# Altium PCB ChrisByrd-IoT_Product.PcbDoc (part 4 of 6)
Units mil, origin at the board's own origin, x right, y up, seen from the top; angles counter-clockwise.
Board outline 5314.96 x 4000 mil, 2 copper layers (Top Layer, Bottom Layer), stack 57 mil thick; 306 components, 230 nets, 1006 pads, 531 vias.
Unrouted connection lines stored in the file: 476.
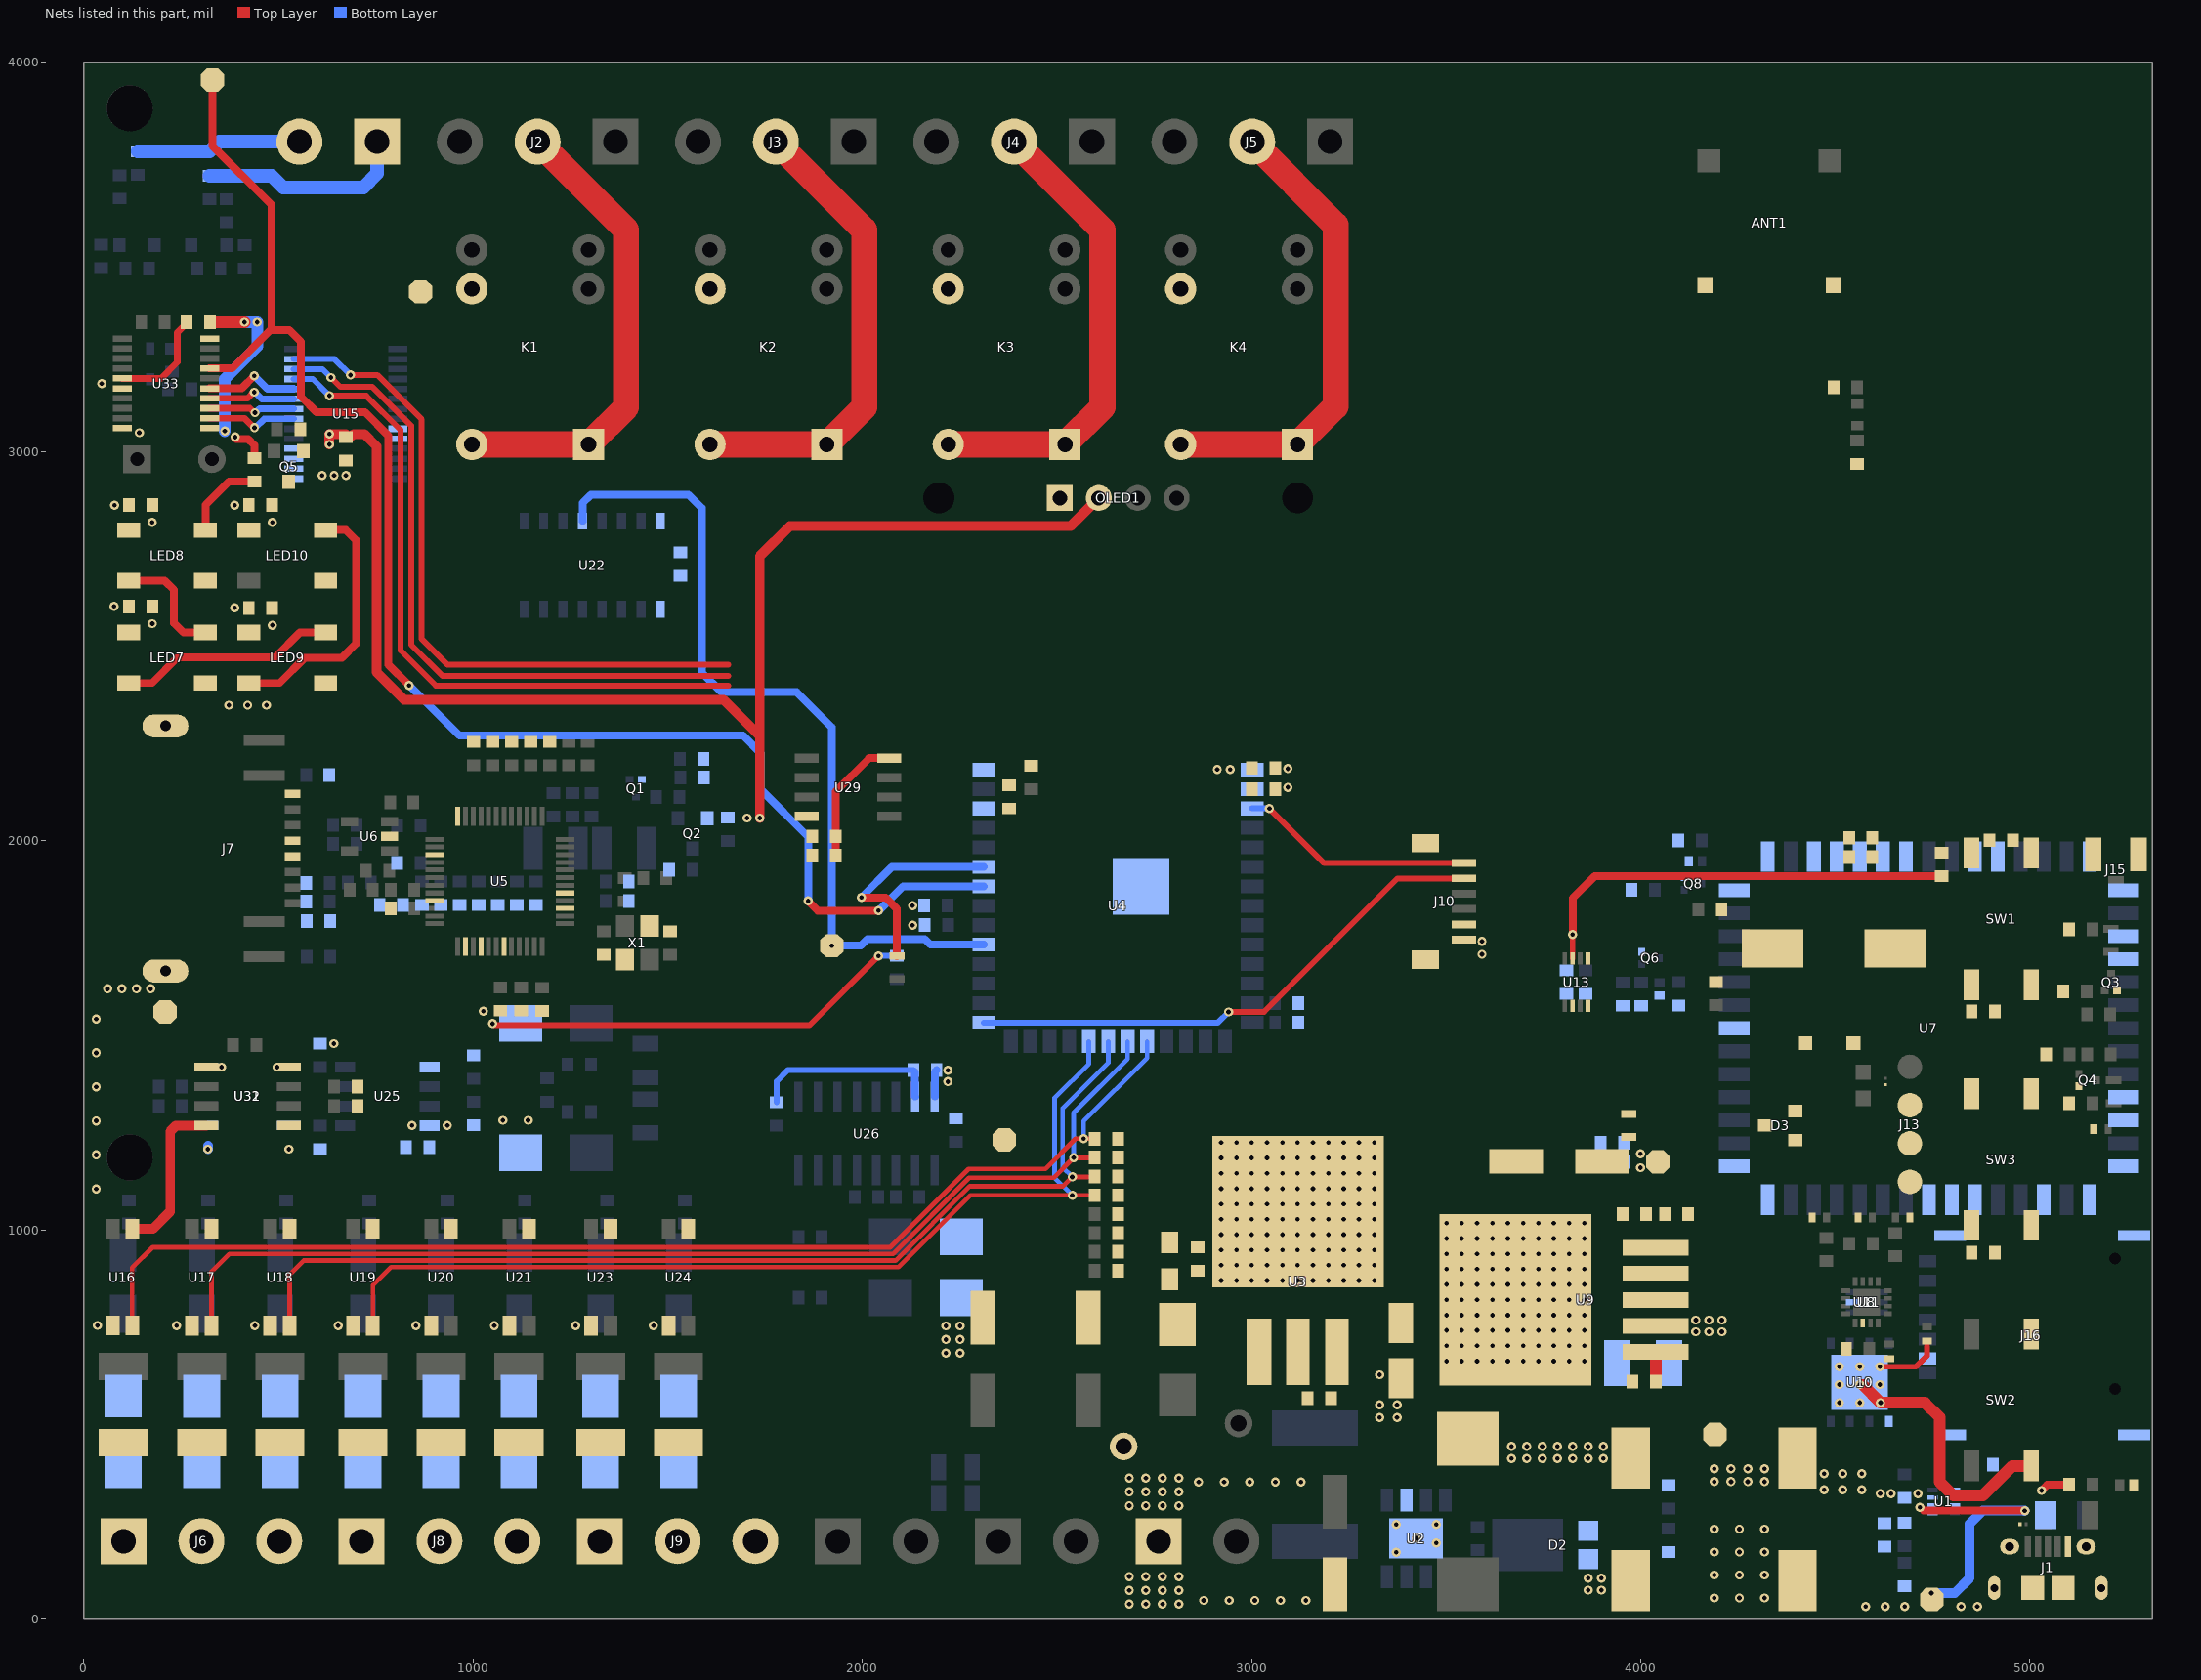
[diagram p2: the nets of this part, all layers, seen from the top]

## Part data (continued)
R8 R26 R37: library part RC0603FR-070RL, "RES SMD 0R, 1%, 0.1W, 0603", LCSC Part Number=C100044, Manufacturer=Yageo, Package=0603, ComponentLink9Description=LCSC, ComponentLink9URL=https://www.lcsc.com/product-detail/Chip-Resistor-Surface-Mount_YAGEO-RC0603FR-070RL_C100044.html, Item Type=Resistor, Manufacturer Part Number=RC0603FR-070RL
R9 R10 R18 R19: library part RC0603FR-0749R9L, "RES 49.9 OHM 1% 1/10W 0603", Case Code (Imperial)=0603, Case Code (Metric)=1608, LCSC Part Number=C114625, Manufacturer=Yageo, Max Operating Temperature=155°C, Max Power Dissipation=100mW, Min Operating Temperature=-55°C, Resistance Tolerance=1%, Resistor Type="Thick Film", Temperature Coefficient=100ppm/°C, Voltage Rating=50V, Case/Package=0603, Category="Chip SMD Resistors", ComponentLink1Description=https://datasheet.ciiva.com/11808/0900766b80f96399-11808223.pdf?src-supplier=RSComponents, ComponentLink1URL=https://datasheet.ciiva.com/11808/0900766b80f96399-11808223.pdf?src-supplier=RSComponents, ComponentLink2Description=https://datasheet.ciiva.com/22747/443971-22747527.pdf?src-supplier=Element14, ComponentLink2URL=https://datasheet.ciiva.com/22747/443971-22747527.pdf?src-supplier=Element14, ComponentLink3Description=https://datasheet.ciiva.com/15189/getdatasheetpartid-325421-15189750.pdf?src-supplier=Verical, ComponentLink3URL=https://datasheet.ciiva.com/15189/getdatasheetpartid-325421-15189750.pdf?src-supplier=Verical, Construction=Rectangular, Depth=0.8mm, Features="Moisture Resistant", Height=0.45mm, Item Type=Resistor, Lead Free="Lead Free", Length=1.6mm, Manufacturer Part Number=RC0603FR-0749R9L, Military Standard=Not, Number of Pins=2, Number of Terminations=2, Packaging="Tape and Reel", Power Rating=100mW, Pricing 1="5000=0.00280 (USD)", REACH SVHC="No SVHC", Resistance=49.9R, RoHS=Yes, RoHS Compliant=Yes, Series=RC, Size Code=0603, Stock 1=2075000, Supplier 1="Arrow Electronics", Supplier Part Number 1=RC0603FR-0749R9L, Technology="THICK FILM", Termination=SMD/SMT, Tolerance=1%, Voltage Rating (DC)=50V
R11 R64: library part RC0603FR-0710RL, "RES SMD 10 OHM 1% 1/10W 0603", Case Code (Imperial)=0603, Case Code (Metric)=1608, LCSC Part Number=C109318, Manufacturer=Yageo, Max Operating Temperature=155°C, Min Operating Temperature=-55°C, Power Rating=100mW, Supplier Part Number 1=311-10.0HRDKR-ND, Temperature Coefficient=200ppm/°C, Tolerance=1%, Voltage Rating=50V, Case/Package=0603, ComponentLink1Description=http://www.farnell.com/datasheets/1868787.pdf?src-supplier=Element14, ComponentLink1URL=http://www.farnell.com/datasheets/1868787.pdf?src-supplier=Element14, ComponentLink2Description=http://www.yageo.com/documents/recent/PYu-RC0603_51_RoHS_L_4.pdf?src-supplier=Avnet, ComponentLink2URL=http://www.yageo.com/documents/recent/PYu-RC0603_51_RoHS_L_4.pdf?src-supplier=Avnet, ComponentLink3Description=http://documents.rs-components.com/techlib://itc_doclist_GB.htm?stockno=5048984&src-supplier=RSComponents, ComponentLink3URL=http://documents.rs-components.com/techlib://itc_doclist_GB.htm?stockno=5048984&src-supplier=RSComponents, ComponentLink4Description=http://www.yageo.com/documents/recent/PYu-RC0603_51_RoHS_L_4.pdf?src-supplier=Avnet+Europe, ComponentLink4URL=http://www.yageo.com/documents/recent/PYu-RC0603_51_RoHS_L_4.pdf?src-supplier=Avnet+Europe, Composition="Thick Film", Contact Plating=Tin,Matte, Depth=0.8mm, Height=0.45mm, Lead Free="Lead Free", Length=1.6mm, Manufacturer Part Number=RC0603FR-0710RL, Military Standard=Not, Number of Pins=2, Packaging="Tape and Reel", Pricing 1="1=0.1, 10=0.046, 100=0.0187, 1000=0.0084, 2500=0.00729 (USD)", Radiation Hardening=No, REACH SVHC="No SVHC", Resistance=10R, Stock 1=10836596, Supplier 1=Digi-Key, Termination=SMD/SMT, Voltage Rating (DC)=50V, Width=0.8mm
  R11: Item Type=Resistor
R12 R13 R15 R17: library part RC0603FR-0733RL, "RES SMD 0603 33 Ohm 1% 1/10W", Case Code (Imperial)=0603, Case Code (Metric)=1608, LCSC Part Number=C108661, Manufacturer=Yageo, Max Operating Temperature=155°C, Max Power Dissipation=100mW, Min Operating Temperature=-55°C, Package Quantity=1, Resistance Tolerance=1%, Resistor Type="Thick Film", Supplier Part Number 1=311-33.0HRCT-ND, Temperature Coefficient=100ppm/°C, Voltage Rating=75V, Voltage Rating (DC)=50V, Case/Package=0603, Category="Chip SMD Resistors", ComponentLink1Description=https://datasheet.ciiva.com/11808/0900766b80f96399-11808741.pdf?src-supplier=RSComponents, ComponentLink1URL=https://datasheet.ciiva.com/11808/0900766b80f96399-11808741.pdf?src-supplier=RSComponents, ComponentLink2Description=https://datasheet.ciiva.com/2453/pyu-r-int-thick-7-2453952.pdf?src-supplier=Digi-Key, ComponentLink2URL=https://datasheet.ciiva.com/2453/pyu-r-int-thick-7-2453952.pdf?src-supplier=Digi-Key, ComponentLink3Description=https://datasheet.ciiva.com/2453/pyu-r-int-thick-7-2453953.pdf?src-supplier=Digi-Key, ComponentLink3URL=https://datasheet.ciiva.com/2453/pyu-r-int-thick-7-2453953.pdf?src-supplier=Digi-Key, ComponentLink4Description=https://datasheet.ciiva.com/2453/pyu-r-int-thick-7-2453954.pdf?src-supplier=Digi-Key, ComponentLink4URL=https://datasheet.ciiva.com/2453/pyu-r-int-thick-7-2453954.pdf?src-supplier=Digi-Key, ComponentLink5Description=https://datasheet.ciiva.com/7660/38590-7660792.pdf?src-supplier=Element14, ComponentLink5URL=https://datasheet.ciiva.com/7660/38590-7660792.pdf?src-supplier=Element14, ComponentLink6Description=https://datasheet.ciiva.com/15189/getdatasheetpartid-326673-15189708.pdf?src-supplier=Verical, ComponentLink6URL=https://datasheet.ciiva.com/15189/getdatasheetpartid-326673-15189708.pdf?src-supplier=Verical, ComponentLink7Description=https://datasheet.ciiva.com/7746/443971-7746334.pdf?src-supplier=Element14, ComponentLink7URL=https://datasheet.ciiva.com/7746/443971-7746334.pdf?src-supplier=Element14, ComponentLink8Description=https://datasheet.ciiva.com/7746/443971-7746335.pdf?src-supplier=Element14, ComponentLink8URL=https://datasheet.ciiva.com/7746/443971-7746335.pdf?src-supplier=Element14, ComponentLink9Description=https://datasheet.ciiva.com/46395/443971-46395007.pdf?src-supplier=Element14, ComponentLink9URL=https://datasheet.ciiva.com/46395/443971-46395007.pdf?src-supplier=Element14, Construction=Rectangular, Depth=0.8mm, Features="Moisture Resistant", Height=0.45mm, Item Type=Resistor, Lead Free="Lead Free", Lead Pitch=0.3mm, Length=1.6mm, Manufacturer Part Number=RC0603FR-0733RL, Military Standard=Not, Number of Pins=2, Number of Terminations=2, Packaging="Tape and Reel", Power Rating=100mW, Pricing 1="1=0.10000, 10=0.02400, 100=0.00970, 1000=0.00436, 2500=0.00378 (USD)", REACH SVHC="No SVHC", Resistance=33R, RoHS=Yes, RoHS Compliant=Yes, Series=RC, Size Code=0603, Stock 1=41, Supplier 1=Digi-Key, Technology="THICK FILM", Termination=SMD/SMT, Tolerance=1%, Weight=7.1E-05oz, Width=0.8mm
R20 R21: library part RC0603JR-07330RL, "RES  SMD 330R 100 mW 0603", Case Code (Imperial)=0603, Case Code (Metric)=1608, LCSC Part Number=C105879, Manufacturer=Yageo, Max Operating Temperature=155°C, Max Power Dissipation=100mW, Min Operating Temperature=-55°C, Package Quantity=5000, Resistance Tolerance=5%, Resistor Type="Thick Film", Supplier Part Number 1=311-330GRCT-ND, Temperature Coefficient=100ppm/°C, Voltage Rating=50V, Case/Package=0603, Category="Chip SMD Resistors", Construction=Rectangular, Depth=0.8mm, Features="Moisture Resistant", Height=0.45mm, Item Type=Resistor, Lead Free="Lead Free", Length=1.6mm, Manufacturer Part Number=RC0603JR-07330RL, Military Standard=Not, Number of Pins=2, Number of Terminations=2, Packaging="Tape and Reel", Power Rating=100mW, Pricing 1="1=0.10000, 10=0.02000, 100=0.00800, 1000=0.00360, 2500=0.00312 (USD)", REACH SVHC="No SVHC", Resistance=330R, RoHS=Yes, RoHS Compliant=Yes, Series=RC, Size Code=0603, Stock 1=1074593, Supplier 1=Digi-Key, Termination=SMD/SMT, Tolerance=5%, Voltage Rating (DC)=50V, Width=0.8mm
R25: library part RC0603FR-071ML, "RES SMD 1M OHM 1% 1/10W 0603", Case Code (Imperial)=0603, Case Code (Metric)=1608, LCSC Part Number=C105578, Manufacturer=Yageo, Max Operating Temperature=155°C, Min Operating Temperature=-55°C, Package Quantity=5000, Power Rating=100mW, Resistance=1MR, Supplier Part Number 1=311-1.00MHRDKR-ND, Temperature Coefficient=100ppm/°C, Tolerance=1%, Voltage Rating=50V, Case/Package=0603, ComponentLink1Description=http://www.farnell.com/datasheets/2167052.pdf?src-supplier=Mouser, ComponentLink1URL=http://www.farnell.com/datasheets/2167052.pdf?src-supplier=Mouser, ComponentLink2Description=http://www.farnell.com/datasheets/2167052.pdf?src-supplier=Element14, ComponentLink2URL=http://www.farnell.com/datasheets/2167052.pdf?src-supplier=Element14, ComponentLink3Description=http://documents.rs-components.com/techlib://itc_doclist_GB.htm?stockno=5048956&src-supplier=RSComponents, ComponentLink3URL=http://documents.rs-components.com/techlib://itc_doclist_GB.htm?stockno=5048956&src-supplier=RSComponents, Composition="Thick Film", Depth=0.8mm, Height=0.45mm, Lead Free="Lead Free", Length=1.6mm, Manufacturer Part Number=RC0603FR-071ML, Military Standard=Not, Number of Pins=2, Packaging="Tape and Reel", Pricing 1="1=0.1, 10=0.023, 100=0.0094, 1000=0.00421, 2500=0.00366 (USD)", REACH SVHC="No SVHC", Stock 1=3824601, Supplier 1=Digi-Key, Termination=SMD/SMT, Voltage Rating (DC)=50V, Width=0.8mm
R33: library part RC0603FR-0712K4L, "RES SMD 12.4K OHM 1% 1/10W 0603", Case Code (Imperial)=0603, Case Code (Metric)=1608, LCSC Part Number=C137798, Manufacturer=Yageo, Max Operating Temperature=155°C, Max Power Dissipation=100mW, Min Operating Temperature=-55°C, Package Quantity=1, Resistance=12.4kR, Resistor Type="Thick Film", Supplier Part Number 1=311-12.4KHRCT-ND, Temperature Coefficient=100ppm/°C, Tolerance=1%, Voltage Rating=50V, Working Voltage=75V, Case/Package=0603, Category="Chip SMD Resistors", ComponentLink1Description=https://datasheet.ciiva.com/2454/pyu-r-int-thick-7-2454069.pdf?src-supplier=Digi-Key, ComponentLink1URL=https://datasheet.ciiva.com/2454/pyu-r-int-thick-7-2454069.pdf?src-supplier=Digi-Key, ComponentLink2Description=https://datasheet.ciiva.com/2454/pyu-r-int-thick-7-2454070.pdf?src-supplier=Digi-Key, ComponentLink2URL=https://datasheet.ciiva.com/2454/pyu-r-int-thick-7-2454070.pdf?src-supplier=Digi-Key, ComponentLink3Description=https://datasheet.ciiva.com/2454/pyu-r-int-thick-7-2454071.pdf?src-supplier=Digi-Key, ComponentLink3URL=https://datasheet.ciiva.com/2454/pyu-r-int-thick-7-2454071.pdf?src-supplier=Digi-Key, Construction=Rectangular, Depth=0.8mm, Features="Moisture Resistant", Height=0.022inch, Lead Free="Lead Free", Length=0.063inch, Manufacturer Part Number=RC0603FR-0712K4L, Military Standard=Not, Number of Terminations=2, Packaging="Tape and Reel", Power Rating=100mW, Pricing 1="1=0.10000, 10=0.02400, 100=0.00970, 1000=0.00436, 2500=0.00378 (USD)", RoHS=Yes, RoHS Compliant=Yes, Series=RC, Stock 1=494008, Supplier 1=Digi-Key, Technology="THICK FILM", Termination=SMD/SMT, Voltage Rating (DC)=50V, Width=0.031inch
R34: library part RC0603FR-07470RL, "RES 470 OHM 1% 1/10W 0603", Case Code (Imperial)=0603, Case Code (Metric)=1608, LCSC Part Number=C114669, Manufacturer=Yageo, Max Operating Temperature=155°C, Max Power Dissipation=100mW, Min Operating Temperature=-55°C, Package Quantity=1, Resistance Tolerance=1%, Resistor Type="Thick Film", Supplier Part Number 1=311-470HRCT-ND, Temperature Coefficient=100ppm/°C, Voltage Rating=50V, Working Voltage=75V, Case/Package=0603, Category="Chip SMD Resistors", ComponentLink1Description=https://datasheet.ciiva.com/11808/0900766b80f96399-11808177.pdf?src-supplier=RSComponents, ComponentLink1URL=https://datasheet.ciiva.com/11808/0900766b80f96399-11808177.pdf?src-supplier=RSComponents, ComponentLink2Description=https://datasheet.ciiva.com/7746/1738695-7746359.pdf?src-supplier=Element14, ComponentLink2URL=https://datasheet.ciiva.com/7746/1738695-7746359.pdf?src-supplier=Element14, ComponentLink3Description=https://datasheet.ciiva.com/7746/1738695-7746360.pdf?src-supplier=Element14, ComponentLink3URL=https://datasheet.ciiva.com/7746/1738695-7746360.pdf?src-supplier=Element14, ComponentLink4Description=https://datasheet.ciiva.com/7660/1868787-7660793.pdf?src-supplier=Element14, ComponentLink4URL=https://datasheet.ciiva.com/7660/1868787-7660793.pdf?src-supplier=Element14, ComponentLink5Description=https://datasheet.ciiva.com/46440/1868787-46440907.pdf?src-supplier=Element14, ComponentLink5URL=https://datasheet.ciiva.com/46440/1868787-46440907.pdf?src-supplier=Element14, ComponentLink6Description=https://datasheet.ciiva.com/2454/pyu-r-int-thick-7-2454012.pdf?src-supplier=Digi-Key, ComponentLink6URL=https://datasheet.ciiva.com/2454/pyu-r-int-thick-7-2454012.pdf?src-supplier=Digi-Key, ComponentLink7Description=https://datasheet.ciiva.com/2454/pyu-r-int-thick-7-2454013.pdf?src-supplier=Digi-Key, ComponentLink7URL=https://datasheet.ciiva.com/2454/pyu-r-int-thick-7-2454013.pdf?src-supplier=Digi-Key, ComponentLink8Description=https://datasheet.ciiva.com/2454/pyu-r-int-thick-7-2454014.pdf?src-supplier=Digi-Key, ComponentLink8URL=https://datasheet.ciiva.com/2454/pyu-r-int-thick-7-2454014.pdf?src-supplier=Digi-Key, Construction=Rectangular, Depth=0.8mm, Features="Moisture Resistant", Height=0.022inch, Lead Free="Lead Free", Length=1.6mm, Manufacturer Part Number=RC0603FR-07470RL, Military Standard=Not, Number of Terminations=2, Packaging="Tape and Reel", Power Rating=100mW, Pricing 1="1=0.10000, 10=0.02400, 100=0.00970, 1000=0.00436, 2500=0.00378 (USD)", REACH SVHC="No SVHC", Resistance=470R, RoHS=Yes, RoHS Compliant=Yes, Series=RC, Stock 1=154083, Supplier 1=Digi-Key, Technology="THICK FILM", Termination=SMD/SMT, Tolerance=1%, Width=0.031inch
R36 R39 R100 R101 R102 R103: library part RC0603FR-0722RL, "RES 22 OHM 1% 1/10W 0603", Case Code (Imperial)=0603, Case Code (Metric)=1608, LCSC Part Number=C107701, Manufacturer=Yageo, Max Operating Temperature=155°C, Max Power Dissipation=100mW, Min Operating Temperature=-55°C, Package Quantity=1, Resistance Tolerance=1%, Resistor Type="Thick Film", Temperature Coefficient=100ppm/°C, Voltage Rating=50V, Case/Package=0603, Category="Chip SMD Resistors", ComponentLink1Description=https://datasheet.ciiva.com/11819/0900766b80f96399-11819285.pdf?src-supplier=RSComponents, ComponentLink1URL=https://datasheet.ciiva.com/11819/0900766b80f96399-11819285.pdf?src-supplier=RSComponents, ComponentLink2Description=https://datasheet.ciiva.com/46395/443971-46395032.pdf?src-supplier=Element14, ComponentLink2URL=https://datasheet.ciiva.com/46395/443971-46395032.pdf?src-supplier=Element14, ComponentLink3Description=https://datasheet.ciiva.com/46440/1868787-46440901.pdf?src-supplier=Element14, ComponentLink3URL=https://datasheet.ciiva.com/46440/1868787-46440901.pdf?src-supplier=Element14, ComponentLink4Description=https://datasheet.ciiva.com/2454/pyu-r-int-thick-7-2454355.pdf?src-supplier=Digi-Key, ComponentLink4URL=https://datasheet.ciiva.com/2454/pyu-r-int-thick-7-2454355.pdf?src-supplier=Digi-Key, ComponentLink5Description=https://datasheet.ciiva.com/2454/pyu-r-int-thick-7-2454356.pdf?src-supplier=Digi-Key, ComponentLink5URL=https://datasheet.ciiva.com/2454/pyu-r-int-thick-7-2454356.pdf?src-supplier=Digi-Key, ComponentLink6Description=https://datasheet.ciiva.com/2454/pyu-r-int-thick-7-2454354.pdf?src-supplier=Digi-Key, ComponentLink6URL=https://datasheet.ciiva.com/2454/pyu-r-int-thick-7-2454354.pdf?src-supplier=Digi-Key, Construction=Rectangular, Depth=0.8mm, Features="Moisture Resistant", Height=0.022inch, Item Type=Resistor, Lead Free="Lead Free", Length=0.063inch, Manufacturer Part Number=RC0603FR-0722RL, Military Standard=Not, Number of Pins=2, Number of Terminations=2, Packaging="Tape and Reel", Power Rating=100mW, Pricing 1="5000=0.00133, 10000=0.00131, 20000=0.00127 (USD)", Reach SVHC Compliant=Yes, Resistance=22R, RoHS=Yes, RoHS Compliant=Yes, Series=RC, Size Code=0603, Stock 1=190000, Supplier 1=Avnet, Supplier Part Number 1=RC0603FR-0722RL, Technology="THICK FILM", Termination=SMD/SMT, Tolerance=1%, Voltage Rating (DC)=50V, Width=0.031inch
R40 R43: library part RC0603FR-07180RL, "RES 180 OHM 1% 1/10W 0603", Case Code (Imperial)=0603, Case Code (Metric)=1608, LCSC Part Number=C137786, Manufacturer=Yageo, Max Operating Temperature=155°C, Max Power Dissipation=100mW, Min Operating Temperature=-55°C, Package Quantity=1, Resistance Tolerance=1%, Resistor Type="Thick Film", Temperature Coefficient=100ppm/°C, Voltage Rating=50V, Case/Package=0603, Category="Chip SMD Resistors", ComponentLink1Description=https://datasheet.ciiva.com/2454/pyu-r-int-thick-7-2454469.pdf?src-supplier=Digi-Key, ComponentLink1URL=https://datasheet.ciiva.com/2454/pyu-r-int-thick-7-2454469.pdf?src-supplier=Digi-Key, ComponentLink2Description=https://datasheet.ciiva.com/2454/pyu-r-int-thick-7-2454470.pdf?src-supplier=Digi-Key, ComponentLink2URL=https://datasheet.ciiva.com/2454/pyu-r-int-thick-7-2454470.pdf?src-supplier=Digi-Key, ComponentLink3Description=https://datasheet.ciiva.com/2454/pyu-r-int-thick-7-2454468.pdf?src-supplier=Digi-Key, ComponentLink3URL=https://datasheet.ciiva.com/2454/pyu-r-int-thick-7-2454468.pdf?src-supplier=Digi-Key, ComponentLink4Description=https://datasheet.ciiva.com/7746/443971-7746267.pdf?src-supplier=Element14, ComponentLink4URL=https://datasheet.ciiva.com/7746/443971-7746267.pdf?src-supplier=Element14, ComponentLink5Description=https://datasheet.ciiva.com/7746/443971-7746266.pdf?src-supplier=Element14, ComponentLink5URL=https://datasheet.ciiva.com/7746/443971-7746266.pdf?src-supplier=Element14, ComponentLink6Description=https://datasheet.ciiva.com/15189/getdatasheetpartid-325160-15189622.pdf?src-supplier=Verical, ComponentLink6URL=https://datasheet.ciiva.com/15189/getdatasheetpartid-325160-15189622.pdf?src-supplier=Verical, Construction=Rectangular, Depth=0.8mm, Features="Moisture Resistant", Height=0.022inch, Item Type=Resistor, Lead Free="Lead Free", Length=1.6mm, Manufacturer Part Number=RC0603FR-07180RL, Military Standard=Not, Number of Pins=2, Number of Terminations=2, Packaging="Tape and Reel", Power Rating=100mW, Pricing 1="5000=0.00133, 10000=0.00131, 20000=0.00127 (USD)", Resistance=180R, RoHS=Yes, RoHS Compliant=Yes, Series=RC, Size Code=0603, Stock 1=35000, Supplier 1=Avnet, Supplier Part Number 1=RC0603FR-07180RL, Termination=SMD/SMT, Tolerance=1%, Voltage Rating (DC)=50V, Width=0.8mm
R41 R44 R47 R50 R62 R63 R90 R91 R95 R96 R97 R98 R99 R104: library part RC0603JR-074K7L, "RES SMD 4.7K OHM 5% 1/10W 0603", Case Code (Imperial)=0603, Case Code (Metric)=1608, LCSC Part Number=C105428, Manufacturer=Yageo, Max Operating Temperature=155°C, Min Operating Temperature=-55°C, Power Rating=100mW, Resistance=4.7kR, Supplier Part Number 1=311-4.7KGRCT-ND, Temperature Coefficient=100ppm/°C, Tolerance=5%, Voltage Rating=50V, Case/Package=0603, ComponentLink1Description=http://www.farnell.com/datasheets/443971.pdf?src-supplier=Element14, ComponentLink1URL=http://www.farnell.com/datasheets/443971.pdf?src-supplier=Element14, Composition="Thick Film", Depth=0.8mm, Item Type=Resistor, Lead Free="Lead Free", Length=1.6mm, Manufacturer Part Number=RC0603JR-074K7L, Military Standard=Not, Number of Pins=2, Packaging="Tape and Reel", Pricing 1="1=0.1, 10=0.02, 100=0.0081, 1000=0.00362, 2500=0.00314 (USD)", REACH SVHC="No SVHC", Stock 1=19706643, Supplier 1=Digi-Key, Termination=SMD/SMT, Voltage Rating (DC)=50V, Width=0.8mm
R42 R45 R46 R48 R51 R73: library part RC0603JR-0747KL, "RES 47K OHM 5% 1/10W 0603", Case Code (Imperial)=0603, Case Code (Metric)=1608, LCSC Part Number=C127447, Manufacturer=Yageo, Max Operating Temperature=155°C, Max Power Dissipation=100mW, Min Operating Temperature=-55°C, Package Quantity=5000, Resistance=47kR, Resistance Tolerance=1%, Resistor Type="Thick Film", Temperature Coefficient=100ppm/°C, Tolerance=5%, Voltage Rating=50V, Case/Package=0603, Category="Chip SMD Resistors", ComponentLink1Description=http://www.farnell.com/datasheets/443971.pdf, ComponentLink1URL=http://www.farnell.com/datasheets/443971.pdf, ComponentLink2Description=http://www.mouser.com/catalog/specsheets/RC0603.pdf, ComponentLink2URL=http://www.mouser.com/catalog/specsheets/RC0603.pdf, ComponentLink3Description=https://datasheet.ciiva.com/46395/443971-46395003.pdf?src-supplier=Element14, ComponentLink3URL=https://datasheet.ciiva.com/46395/443971-46395003.pdf?src-supplier=Element14, ComponentLink4Description=https://datasheet.ciiva.com/12558/rc0603-272842-12558744.pdf?src-supplier=Mouser, ComponentLink4URL=https://datasheet.ciiva.com/12558/rc0603-272842-12558744.pdf?src-supplier=Mouser, Composition="Thick Film", Construction=Rectangular, Depth=0.8mm, Features="Moisture Resistant", Height=0.45mm, Lead Free="Lead Free", Length=1.6mm, Manufacturer Part Number=RC0603JR-0747KL, Military Standard=Not, Number of Pins=2, Number of Terminations=2, Packaging="Tape and Reel", Power Rating=100mW, Pricing 1="5000=0.0025, 10000=0.0022, 25000=0.0019, 1=0.0011, 6000=0.001 (USD)", Pricing 2="1=0.10000, 10=0.02300, 100=0.00930, 1000=0.00417, 2500=0.00362 (USD)", REACH SVHC="No SVHC", RoHS=Yes, RoHS Compliant=Yes, Series=RC, Size Code=0603, Stock 1=599135, Stock 2=1087850, Supplier 1=Arrow, Supplier 2=Digi-Key, Supplier Part Number 1=RC0603JR-0747KL, Supplier Part Number 2=311-30.0KHRCT-ND, Termination=SMD/SMT, Voltage Rating (DC)=50V, Width=0.8mm
R53: library part 0603WAF3241T5E, "100mW Thick Film Resistors ±1% 3.24kΩ 0603 Chip Resistor - Surface Mount ROHS", LCSC Part Number=C22994, Manufacturer=UNI-ROYAL, Package=0603, ComponentLink1Description=LCSC, ComponentLink1URL=https://www.lcsc.com/product-detail/Chip-Resistor-Surface-Mount_UNI-ROYAL-Uniroyal-Elec-0603WAF3241T5E_C22994.html, Item Type=Resistor, Manufacturer Part Number=0603WAF3241T5E
R58: library part RC0603FR-07120RL, "RES 120 OHM 1% 1/10W 0603", Case Code (Imperial)=0603, Case Code (Metric)=1608, LCSC Part Number=C114640, Manufacturer=Yageo, Max Operating Temperature=155°C, Max Power Dissipation=100mW, Min Operating Temperature=-55°C, Package Quantity=1, Resistance Tolerance=1%, Resistor Type="Thick Film", Supplier Part Number 1=311-120HRCT-ND, Temperature Coefficient=100ppm/°C, Voltage Rating=50V, Case/Package=0603, Category="Chip SMD Resistors", ComponentLink1Description=https://datasheet.ciiva.com/2553/pyu-r-int-thick-7-2553512.pdf?src-supplier=Digi-Key, ComponentLink1URL=https://datasheet.ciiva.com/2553/pyu-r-int-thick-7-2553512.pdf?src-supplier=Digi-Key, ComponentLink2Description=https://datasheet.ciiva.com/7746/443971-7746248.pdf?src-supplier=Element14, ComponentLink2URL=https://datasheet.ciiva.com/7746/443971-7746248.pdf?src-supplier=Element14, ComponentLink3Description=https://datasheet.ciiva.com/2553/pyu-r-int-thick-7-2553513.pdf?src-supplier=Digi-Key, ComponentLink3URL=https://datasheet.ciiva.com/2553/pyu-r-int-thick-7-2553513.pdf?src-supplier=Digi-Key, ComponentLink4Description=https://datasheet.ciiva.com/7746/443971-7746249.pdf?src-supplier=Element14, ComponentLink4URL=https://datasheet.ciiva.com/7746/443971-7746249.pdf?src-supplier=Element14, ComponentLink5Description=https://datasheet.ciiva.com/2553/pyu-r-int-thick-7-2553514.pdf?src-supplier=Digi-Key, ComponentLink5URL=https://datasheet.ciiva.com/2553/pyu-r-int-thick-7-2553514.pdf?src-supplier=Digi-Key, ComponentLink6Description=https://datasheet.ciiva.com/46395/443971-46395021.pdf?src-supplier=Element14, ComponentLink6URL=https://datasheet.ciiva.com/46395/443971-46395021.pdf?src-supplier=Element14, Construction=Rectangular, Depth=0.8mm, Features="Moisture Resistant", Height=0.022inch, Lead Free="Lead Free", Length=1.6mm, Manufacturer Part Number=RC0603FR-07120RL, Military Standard=Not, Number of Pins=2, Number of Terminations=2, Packaging="Tape and Reel", Power Rating=100mW, Pricing 1="1=0.10000, 10=0.02400, 100=0.00970, 1000=0.00436, 2500=0.00378 (USD)", REACH SVHC="No SVHC", Resistance=120R, RoHS=Yes, RoHS Compliant=Yes, Series=RC, Size Code=0603, Stock 1=839061, Supplier 1=Digi-Key, Termination=SMD/SMT, Tolerance=1%, Voltage Rating (DC)=50V, Width=0.031inch
R68 R69 R75 R76: library part RC0603JR-0756KL, "RES SMD 0603 56K Ohm 5% 0.1W", Case Code (Imperial)=0603, Case Code (Metric)=1608, LCSC Part Number=C137618, Manufacturer=Yageo, Max Operating Temperature=155°C, Max Power Dissipation=100mW, Min Operating Temperature=-55°C, Package Quantity=1, Resistance=56kR, Resistance Tolerance=5%, Resistor Type="Thick Film", Supplier Part Number 1=311-56KGRCT-ND, Temperature Coefficient=100ppm/°C, Voltage Rating=50V, Working Voltage=75V, Case/Package=0603, Category="Chip SMD Resistors", ComponentLink1Description=https://datasheet.ciiva.com/7746/443971-7746519.pdf?src-supplier=Element14, ComponentLink1URL=https://datasheet.ciiva.com/7746/443971-7746519.pdf?src-supplier=Element14, ComponentLink2Description=https://datasheet.ciiva.com/15189/getdatasheetpartid-326541-15189879.pdf?src-supplier=Verical, ComponentLink2URL=https://datasheet.ciiva.com/15189/getdatasheetpartid-326541-15189879.pdf?src-supplier=Verical, ComponentLink3Description=https://datasheet.ciiva.com/7746/443971-7746520.pdf?src-supplier=Element14, ComponentLink3URL=https://datasheet.ciiva.com/7746/443971-7746520.pdf?src-supplier=Element14, ComponentLink4Description=https://datasheet.ciiva.com/2452/pyu-r-int-thick-7-2452986.pdf?src-supplier=Digi-Key, ComponentLink4URL=https://datasheet.ciiva.com/2452/pyu-r-int-thick-7-2452986.pdf?src-supplier=Digi-Key, ComponentLink5Description=https://datasheet.ciiva.com/2452/pyu-r-int-thick-7-2452987.pdf?src-supplier=Digi-Key, ComponentLink5URL=https://datasheet.ciiva.com/2452/pyu-r-int-thick-7-2452987.pdf?src-supplier=Digi-Key, ComponentLink6Description=https://datasheet.ciiva.com/2452/pyu-r-int-thick-7-2452988.pdf?src-supplier=Digi-Key, ComponentLink6URL=https://datasheet.ciiva.com/2452/pyu-r-int-thick-7-2452988.pdf?src-supplier=Digi-Key, Construction=Rectangular, Depth=0.8mm, Features="Moisture Resistant", Height=0.022inch, Lead Free="Lead Free", Length=1.6mm, Manufacturer Part Number=RC0603JR-0756KL, Military Standard=Not, Number of Pins=2, Number of Terminations=2, Packaging="Tape and Reel", Power Rating=100mW, Pricing 1="1=0.10000, 10=0.02000, 100=0.00800, 1000=0.00360, 2500=0.00312 (USD)", REACH SVHC="No SVHC", RoHS=Yes, RoHS Compliant=Yes, Series=RC, Stock 1=305962, Supplier 1=Digi-Key, Technology="THICK FILM", Termination=SMD/SMT, Tolerance=5%, Voltage Rating (DC)=50V, Width=0.031inch
R70: library part RC0603FR-07330KL, "RES 330K OHM 1% 1/10W 0603", Case Code (Imperial)=0603, Case Code (Metric)=1608, LCSC Part Number=C114618, Manufacturer=Yageo, Max Operating Temperature=155°C, Max Power Dissipation=100mW, Min Operating Temperature=-55°C, Resistance Tolerance=1%, Resistor Type="Thick Film", Supplier Part Number 1=9008384, Temperature Coefficient=100ppm/°C, Voltage Rating=75V, Voltage Rating (DC)=50V, Case/Package=0603, Category="Chip SMD Resistors", ComponentLink1Description=https://datasheet.ciiva.com/2455/pyu-r-int-thick-7-2455366.pdf?src-supplier=Digi-Key, ComponentLink1URL=https://datasheet.ciiva.com/2455/pyu-r-int-thick-7-2455366.pdf?src-supplier=Digi-Key, ComponentLink2Description=https://datasheet.ciiva.com/2455/pyu-r-int-thick-7-2455367.pdf?src-supplier=Digi-Key, ComponentLink2URL=https://datasheet.ciiva.com/2455/pyu-r-int-thick-7-2455367.pdf?src-supplier=Digi-Key, ComponentLink3Description=https://datasheet.ciiva.com/2455/pyu-r-int-thick-7-2455365.pdf?src-supplier=Digi-Key, ComponentLink3URL=https://datasheet.ciiva.com/2455/pyu-r-int-thick-7-2455365.pdf?src-supplier=Digi-Key, ComponentLink4Description=https://datasheet.ciiva.com/7746/443971-7746328.pdf?src-supplier=Element14, ComponentLink4URL=https://datasheet.ciiva.com/7746/443971-7746328.pdf?src-supplier=Element14, ComponentLink5Description=https://datasheet.ciiva.com/7746/443971-7746327.pdf?src-supplier=Element14, ComponentLink5URL=https://datasheet.ciiva.com/7746/443971-7746327.pdf?src-supplier=Element14, ComponentLink6Description=https://datasheet.ciiva.com/15189/getdatasheetpartid-323788-15189703.pdf?src-supplier=Verical, ComponentLink6URL=https://datasheet.ciiva.com/15189/getdatasheetpartid-323788-15189703.pdf?src-supplier=Verical, Construction=Rectangular, Depth=0.8mm, Features="Moisture Resistant", Height=0.45mm, Item Type=Resistor, Lead Free="Lead Free", Length=1.6mm, Manufacturer Part Number=RC0603FR-07330KL, Military Standard=Not, Number of Terminations=2, Packaging="Tape and Reel", Pins=2, Power Rating=100mW, Pricing 1="5000=0.0014, 50000=0.0013, 75000=0.0015, 200000=0.0012, 250000=0.0014, 625000=0.0012, 750000=0.0013, 2000000=0.0011, 2500000=0.0012 (USD)", Reach SVHC Compliant=No, RoHS=Yes, RoHS Compliant=Yes, Series=RC, Stock 1=1500000, Supplier 1="Future Electronics", Termination=SMD/SMT, Tolerance=1%, Weight=7.1E-05oz, Width=0.8mm
R72: library part RC0603JR-07100KL, "RES 100K OHM 5% 1/10W 0603", Case Code (Imperial)=0603, Case Code (Metric)=1608, LCSC Part Number=C100048, Manufacturer=Yageo, Max Operating Temperature=155°C, Max Power Dissipation=100mW, Min Operating Temperature=-55°C, Resistance=100kR, Resistance Tolerance=5%, Resistor Type="Thick Film", Supplier Part Number 1=311-100KGRCT-ND, Temperature Coefficient=100ppm/°C, Voltage Rating=50V, Case/Package=0603, Category="Chip SMD Resistors", ComponentLink1Description=https://datasheet.ciiva.com/7746/443971-7746424.pdf?src-supplier=Element14, ComponentLink1URL=https://datasheet.ciiva.com/7746/443971-7746424.pdf?src-supplier=Element14, ComponentLink2Description=https://datasheet.ciiva.com/7983/443971-7983686.pdf?src-supplier=Element14, ComponentLink2URL=https://datasheet.ciiva.com/7983/443971-7983686.pdf?src-supplier=Element14, ComponentLink3Description=https://datasheet.ciiva.com/7746/443971-7746423.pdf?src-supplier=Element14, ComponentLink3URL=https://datasheet.ciiva.com/7746/443971-7746423.pdf?src-supplier=Element14, ComponentLink4Description=https://datasheet.ciiva.com/8887/pyu-rc0603-51-rohs-l-4-8887903.pdf?src-supplier=Avnet, ComponentLink4URL=https://datasheet.ciiva.com/8887/pyu-rc0603-51-rohs-l-4-8887903.pdf?src-supplier=Avnet, Contact Plating=Tin,Matte, Features="Moisture Resistant", Item Type=Resistor, Lead Free="Lead Free", Manufacturer Part Number=RC0603JR-07100KL, Number of Pins=2, Number of Terminations=2, Packaging="Tape and Reel", Power Rating=100mW, Pricing 1="1=0.10000, 10=0.02000, 100=0.00800, 1000=0.00360, 2500=0.00312 (USD)", Radiation Hardening=No, REACH SVHC="No SVHC", RoHS=Yes, RoHS Compliant=Yes, Series=RC, Size Code=0603, Stock 1=1210037, Supplier 1=Digi-Key, Termination=SMD/SMT, Tolerance=5%, Voltage Rating (DC)=50V, Width=0.8mm
R74: library part RT0603BRD0768KL, "RES SMD 68K OHM 0.1% 1/10W 0603", Case Code (Imperial)=0603, Case Code (Metric)=1608, Manufacturer=Yageo, Max Operating Temperature=125°C, Min Operating Temperature=-55°C, Power Rating=100mW, Resistance=68kR, Resistor Type="Thin Film", Supplier Part Number 1=YAG4586CT-ND, Temperature Coefficient=25ppm/°C, Tolerance=0.1%, Voltage Rating=75V, Voltage Rating (DC)=50V, Case/Package=0603, Category="Chip SMD Resistors", ComponentLink1Description=https://datasheet.ciiva.com/12694/pyu-rt-1-to-0-05-rohs-l-4-12694907.pdf?src-supplier=Mouser, ComponentLink1URL=https://datasheet.ciiva.com/12694/pyu-rt-1-to-0-05-rohs-l-4-12694907.pdf?src-supplier=Mouser, Construction=Rectangular, Contact Plating=Tin,Matte, Depth=0.8mm, Lead Free="Lead Free", Length=1.6mm, Manufacturer Part Number=RT0603BRD0768KL, Military Standard=Not, Packaging="Tape and Reel", Pricing 1="1=0.34000, 10=0.28800, 100=0.11260, 1000=0.04716, 2500=0.04322 (USD)", Radiation Hardening=No, RoHS=Yes, RoHS Compliant=Yes, Series=RT, Stock 1=45000, Supplier 1=Digi-Key, Termination=SMD/SMT, Width=800um
R77 R80 R81 R82 R83 R84 R85 R86: library part RC0603FR-072K2L, "RES 2.2K OHM 1% 1/10W 0603", Case Code (Imperial)=0603, Case Code (Metric)=1608, LCSC Part Number=C114662, Manufacturer=Yageo, Max Operating Temperature=155°C, Max Power Dissipation=100mW, Min Operating Temperature=-55°C, Package Quantity=1, Resistance=2.2kR, Resistance Tolerance=1%, Resistor Type="Thick Film", Temperature Coefficient=100ppm/°C, Voltage Rating=50V, Case/Package=0603, Category="Chip SMD Resistors", Construction=Rectangular, Depth=0.8mm, Features="Moisture Resistant", Height=0.022inch, Item Type=Resistor, Lead Free="Lead Free", Length=1.6mm, Manufacturer Part Number=RC0603FR-072K2L, Military Standard=Not, Number of Terminations=2, Packaging="Tape and Reel", Power Rating=100mW, Pricing 1="5000=0.00133, 10000=0.00131, 20000=0.00127 (USD)", RoHS=Yes, RoHS Compliant=Yes, Series=RC, Size Code=0603, Stock 1=733100, Supplier 1=Avnet, Supplier Part Number 1=RC0603FR-072K2L, Termination=SMD/SMT, Tolerance=1%, Width=0.031inch
R109: library part ERJPA3J154V, "RES SMD 150K OHM 5% 1/3W 0603", Case Code (Imperial)=0603, Case Code (Metric)=1608, LCSC Part Number=C445851, Manufacturer=Panasonic, Manufacturer Part Number=ERJ-PA3J154V, Max Operating Temperature=155°C, Max Power Dissipation=250mW, Min Operating Temperature=-55°C, Resistance=150kR, Resistor Type="Thick Film", Temperature Coefficient=200ppm/°C, Tolerance=5%, Case/Package=0603, Category="Chip SMD Resistors", ComponentLink1Description=https://industrial.panasonic.com/cdbs/www-data/pdf/RDO0000/AOA0000C331.pdf?src-supplier=Digi-Key, ComponentLink1URL=https://industrial.panasonic.com/cdbs/www-data/pdf/RDO0000/AOA0000C331.pdf?src-supplier=Digi-Key, Features="Automotive AEC-Q200", Height=0.018inch, Length=0.063inch, Number of Terminations=2, Packaging="Tape and Reel", Pricing 1="1=0.09570, 10=0.08790, 100=0.03390, 1000=0.01520, 2500=0.01310, 5000=0.01070 (USD)", RoHS=Yes, Stock 1=30, Supplier 1="Arrow Electronics", Supplier Part Number 1=ERJ-PA3J154V, Width=0.031inch
R112: "VARISTOR 47V 500A DISC 10MM", Clamping Current=5A, Clamping Voltage=93V, LCSC Part Number=C125513, Manufacturer="TDK EPCOS", Max Operating Temperature=85°C, Max Surge Current=500A, Max Varistor Voltage=51.7V, Max Voltage Rating (AC)=30V, Max Voltage Rating (DC)=38V, Min Operating Temperature=-40°C, Min Varistor Voltage=42.3V, Package Quantity=500, Tolerance=10%, Varistor Voltage=47V, Category=Varistors, ComponentLink1Description=https://datasheet.ciiva.com/11834/0900766b80188ddb-11834267.pdf?src-supplier=Rs, ComponentLink1URL=https://datasheet.ciiva.com/11834/0900766b80188ddb-11834267.pdf?src-supplier=Rs, ComponentLink2Description=https://datasheet.ciiva.com/15155/getdatasheetpartid-111496-15155493.pdf?src-supplier=Verical, ComponentLink2URL=https://datasheet.ciiva.com/15155/getdatasheetpartid-111496-15155493.pdf?src-supplier=Verical, ComponentLink3Description=https://datasheet.ciiva.com/1277/1899727-1277935.pdf?src-supplier=Element14, ComponentLink3URL=https://datasheet.ciiva.com/1277/1899727-1277935.pdf?src-supplier=Element14, Depth=4.4mm, Diameter=10mm, Energy=4.4J, Item Type=Varistor, Lead Length=30mm, Lead Pitch=7.5mm, Lead/Base Style=Radial, Manufacturer Part Number=B72210S0300K101, Mounting Technology="Through Hole,Radial", Number of Circuits=1, Packaging=Bulk, Pricing 1="1=0.3862, 10=0.3035, 25=0.3004, 100=0.2152, 250=0.215, 500=0.1646, 1000=0.1301, 2500=0.1213, 5000=0.1048 (USD)", Reach SVHC Compliant=No, RoHS=Yes, RoHS Compliant=Yes, Series=Standard, Stock 1=14838, Supplier 1="Arrow Electronics", Supplier Part Number 1=B72210S0300K101, Thickness=4.4mm, Voltage Rating (AC)=30V, Voltage Rating (DC)=38V
SB1: "Solder Bridge ON", Manufacturer Part Number="Solder Bridge", Item Type="Solder Bridge"
SW1 SW2 SW3: "50mA Brick nogging SPST 100MΩ 1000000 times 250gf@±30gf 12V SMD Tactile Switches ROHS", LCSC Part Number=C83206, Manufacturer="Korean Hroparts Elec", Package=SMD, ComponentLink1Description=LCSC, ComponentLink1URL=https://www.lcsc.com/product-detail/Tactile-Switches_Korean-Hroparts-Elec-K2-6639SP-C4SC-04_C83206.html, Item Type="Tactile Switch", Manufacturer Part Number=K2-6639SP-C4SC-04
U1: "1.6-V TO 5.5-V, 40-M, 2.5-A, LOW", LCSC Part Number=C3235557, Manufacturer="Texas Instruments", Supplier Part Number 1=595-TPS2116DRLR, Category="Voltage Supervisors", ComponentLink1Description=LCSC, ComponentLink1URL=https://www.lcsc.com/product-detail/Power-Distribution-Switches_Texas-Instruments-TPS2116DRLR_C3235557.html, Item Type=IC, Manufacturer Part Number=TPS2116DRLR, Pricing 1="1=0.9, 10=0.814, 50=0.772, 100=0.634, 1000=0.414, 10000=0.363 (USD)", RoHS=Yes, Stock 1=27931, Supplier 1=Mouser
U2: "IC REG BUCK ADJUSTABLE 5A 8SOPWR", Case/Package=HSOP, LCSC Part Number=C114425, Manufacturer="Texas Instruments", Max Operating Temperature=125°C, Max Output current=5A, Max Output Voltage=31V, Max Supply Voltage=36V, Min Input Voltage=5.5V, Min Operating Temperature=-40°C, Min Output Voltage=1.22V, Package Quantity=1, Quiescent Current=3mA, Supplier Part Number 1=595-TPS5450DDAR, Switching Frequency=500kHz, Category="Voltage Regulators - Switching", ComponentLink1Description=https://datasheet.ciiva.com/15113/getdatasheetpartid-172659-15113657.pdf?src-supplier=Verical, ComponentLink1URL=https://datasheet.ciiva.com/15113/getdatasheetpartid-172659-15113657.pdf?src-supplier=Verical, ComponentLink2Description=https://datasheet.ciiva.com/2035/tps5450-2035367.pdf?src-supplier=Digi-Key, ComponentLink2URL=https://datasheet.ciiva.com/2035/tps5450-2035367.pdf?src-supplier=Digi-Key, ComponentLink3Description=https://datasheet.ciiva.com/2035/tps5450-2035366.pdf?src-supplier=Digi-Key, ComponentLink3URL=https://datasheet.ciiva.com/2035/tps5450-2035366.pdf?src-supplier=Digi-Key, ComponentLink4Description=https://datasheet.ciiva.com/2035/tps5450-2035368.pdf?src-supplier=Digi-Key, ComponentLink4URL=https://datasheet.ciiva.com/2035/tps5450-2035368.pdf?src-supplier=Digi-Key, ComponentLink5Description=https://datasheet.ciiva.com/14303/tps5450-14303689.pdf?src-supplier=Avnet, ComponentLink5URL=https://datasheet.ciiva.com/14303/tps5450-14303689.pdf?src-supplier=Avnet, ComponentLink6Description=https://datasheet.ciiva.com/3220/tps5450-3220230.pdf?src-supplier=Avnet, ComponentLink6URL=https://datasheet.ciiva.com/3220/tps5450-3220230.pdf?src-supplier=Avnet, Efficiency=90%, Height=1.55mm, Item Type=IC, Lead Free="Lead Free", Length=5mm, Manufacturer Part Number=TPS5450DDAR, Mounting Technology="Surface Mount", Number of Outputs=1, Operating Supply Voltage=36V, Output Current=5A, Output Type=Adjustable, Output Voltage=31V, Packaging="Tape and Reel", Pins=8, Pricing 1="1=5.44, 10=4.88, 50=4.62, 100=4, 1000=2.9, 10000=2.8 (USD)", Radiation Hardening=No, RoHS=Yes, RoHS Compliant=Yes, Series=SWIFT™, Stock 1=10304, Supplier 1=Mouser, Synchronous Rectifier=No, Weight=0.00249oz, Width=4mm
U3: "72dB@(120Hz) 5A Fixed 3.3V~3.3V Positive 12V TO-263-3 Linear Voltage Regulators (LDO) ROHS", LCSC Part Number=C259972, Manufacturer=HGSEMI, Package=TO-263-3, ComponentLink1Description=LCSC, ComponentLink1URL=https://www.lcsc.com/product-detail/Linear-Voltage-Regulators-LDO_HGSEMI-LM1084S-3-3-TR_C259972.html, Item Type=IC, Manufacturer Part Number=LM1084S-3.3/TR
U4: "SMD,18x25.5mm WiFi Modules ROHS", LCSC Part Number=C2913204, Manufacturer="Espressif Systems", Supplier Part Number 1=1965-ESP32-S3-WROOM-1-N8R2-ND, Category=Uncategorized, ComponentLink1Description=LCSC, ComponentLink1URL=https://www.lcsc.com/product-detail/WiFi-Modules_Espressif-Systems-ESP32-S3-WROOM-1-N8R2_C2913204.html, Item Type=Module, Manufacturer Part Number=ESP32-S3-WROOM-1-N8R2, RoHS=No, Supplier 1=Digi-Key
U5: "SPI LQFP-48(7x7) Ethernet ICs ROHS", LCSC Part Number=C32843, Manufacturer=WIZNET, Package=LQFP-48(7x7), ComponentLink1Description=LCSC, ComponentLink1URL=https://www.lcsc.com/product-detail/Ethernet-ICs_WIZNET-W5500_C32843.html, Item Type=IC, Manufacturer Part Number=W5500
U6: "TVS DIODE 5.5VWM 8.5VC SOT23-5", Breakdown Voltage=5.5V, Case/Package=SOT-23, Clamping Voltage=7.8V, Clamping Voltage-Max=8V, LCSC Part Number=C10675, Leakage Current=100nA, Manufacturer=Littelfuse, Max Operating Temperature=85°C, Max Power Dissipation=225mW, Min Operating Temperature=-40°C, Power Line Protection=No, Supplier Part Number 1=3283009, Voltage Rating (DC)=5V, Category="TVS Diodes", ComponentLink1Description=https://datasheet.ciiva.com/15143/getdatasheetpartid-152299-15143806.pdf?src-supplier=Verical, ComponentLink1URL=https://datasheet.ciiva.com/15143/getdatasheetpartid-152299-15143806.pdf?src-supplier=Verical, ComponentLink2Description=https://datasheet.ciiva.com/4509/sp05x-leadfree-4509638.pdf?src-supplier=Mouser, ComponentLink2URL=https://datasheet.ciiva.com/4509/sp05x-leadfree-4509638.pdf?src-supplier=Mouser, ComponentLink3Description=https://datasheet.ciiva.com/22697/1911798-22697943.pdf?src-supplier=Element14, ComponentLink3URL=https://datasheet.ciiva.com/22697/1911798-22697943.pdf?src-supplier=Element14, ComponentLink4Description=https://datasheet.ciiva.com/8062/littefuse-spa-sp050x-8062425.pdf?src-supplier=Element14, ComponentLink4URL=https://datasheet.ciiva.com/8062/littefuse-spa-sp050x-8062425.pdf?src-supplier=Element14, ComponentLink5Description=https://datasheet.ciiva.com/332/sp05xxba-332619.pdf?src-supplier=Digi-Key, ComponentLink5URL=https://datasheet.ciiva.com/332/sp05xxba-332619.pdf?src-supplier=Digi-Key, ComponentLink6Description=https://datasheet.ciiva.com/332/sp05xxba-332620.pdf?src-supplier=Digi-Key, ComponentLink6URL=https://datasheet.ciiva.com/332/sp05xxba-332620.pdf?src-supplier=Digi-Key, ComponentLink7Description=https://datasheet.ciiva.com/16393/sp05xxba-16393404.pdf?src-supplier=Future+Electronics, ComponentLink7URL=https://datasheet.ciiva.com/16393/sp05xxba-16393404.pdf?src-supplier=Future+Electronics, ComponentLink8Description=https://datasheet.ciiva.com/332/sp05xxba-332621.pdf?src-supplier=Digi-Key, ComponentLink8URL=https://datasheet.ciiva.com/332/sp05xxba-332621.pdf?src-supplier=Digi-Key, ComponentLink9Description=https://datasheet.ciiva.com/1268/526672-1268494.pdf?src-supplier=Element14, ComponentLink9URL=https://datasheet.ciiva.com/1268/526672-1268494.pdf?src-supplier=Element14, Depth=1.75mm, Diode Type=ZENER, Direction=Unidirectional, ESD Protection=Yes, Height=1.3mm, Item Type="TVS Diode", Lead Free="Lead Free", Length=3.05mm, Manufacturer Part Number=SP0504BAHTG, Max Reverse Leakage Current=100nA, Mounting Technology="Surface Mount", Number of Channels=4, Number of Elements=4, Number of Unidirectional Channels=4, Packaging="Tape and Reel", Peak Pulse Power=225mW, Pins=5, Polarity=Bidirectional,Unidirectional, Power Dissipation=225mW, Pricing 1="1=0.78, 15=0.685, 75=0.625, 300=0.575, 1500=0.52 (USD)", Radiation Hardening=No, Reach SVHC Compliant=Unknown, Reverse Standoff Voltage=5.5V, RoHS=Yes, RoHS Compliant=Yes, Series="SP05, SPA®", Stock 1=1611, Supplier 1="Future Electronics", Termination=SMD/SMT, Width=1.75mm, Working Voltage=5.5V
U7: "SMD,30x30mm 2G/3G/4G/5G Modules ROHS", LCSC Part Number=C126259, Manufacturer=SIMCom, Package=SMD,30x30mm, ComponentLink1Description=LCSC, ComponentLink1URL=https://www.lcsc.com/product-detail/2G-3G-4G-5G-Modules_SIMCom-Wireless-Solutions-SIM7500E_C126259.html, Item Type=IC, Manufacturer Part Number=SIM7500E
U8: "15V 5 Unidirectional 5V SOT-363 ESD Protection Devices ROHS", LCSC Part Number=C5180312, Manufacturer=ElecSuper, Package=SOT-363, ComponentLink1Description=LCSC, ComponentLink1URL=https://www.lcsc.com/product-detail/ESD-Protection-Devices_ElecSuper-SMF05CT1G-ES_C5180312.html, Item Type="ESD Diode", Manufacturer Part Number=SMF05CT1G-ES
U9: "IC REG LDO ADJ 3A TO263-5", Case/Package=TO-263, Dropout Voltage=370mV, Input Bias Current=40nA, LCSC Part Number=C11149, Manufacturer=Microchip, Max Input Voltage=26V, Max Operating Temperature=125°C, Max Output current=3A, Max Output Voltage=25V, Min Input Voltage=2.5V, Min Operating Temperature=-40°C, Min Output Voltage=1.25V, Package Quantity=750, Quiescent Current=35mA, Reference Voltage=1.24V, Supplier Part Number 1=3153683, Accuracy=1%, Category="Voltage Regulators - Linear", ComponentLink1Description=https://datasheet.ciiva.com/23772/1572633-23772885.pdf?src-supplier=Newark, ComponentLink1URL=https://datasheet.ciiva.com/23772/1572633-23772885.pdf?src-supplier=Newark, ComponentLink2Description=https://datasheet.ciiva.com/16296/mic29150-16296190.pdf?src-supplier=Future+Electronics, ComponentLink2URL=https://datasheet.ciiva.com/16296/mic29150-16296190.pdf?src-supplier=Future+Electronics, ComponentLink3Description=https://datasheet.ciiva.com/15200/getdatasheetpartid-143209-15200663.pdf?src-supplier=Verical, ComponentLink3URL=https://datasheet.ciiva.com/15200/getdatasheetpartid-143209-15200663.pdf?src-supplier=Verical, Height=4.59mm, Item Type=IC, Lead Free="Lead Free", Length=10.67mm, Manufacturer Part Number=MIC29302WU-TR, Mount="Surface Mount", Number of Outputs=1, Number of Pins=5, Number of Regulators=1, Output Configuration=Positive, Output Current=3A, Output Type=Adjustable, Output Voltage=26V, Packaging="Tape and Reel", Polarity=Positive, Pricing 1="750=2.12000, 1500=2.09000, 2250=2.07000, 3000=2.06000, 3750=2.02000 (USD)", Radiation Hardening=No, Reach SVHC Compliant=Yes, RoHS=Yes, RoHS Compliant=Yes, Series=-, Supplier 1="Future Electronics", Width=9.17mm
U10: "GLOBAL IOT EMBEDDED SIM CHIP", Manufacturer=Hologram, Supplier Part Number 1=1887-1002-1-ND, ComponentLink1Description=https://media.digikey.com/pdf/Data%20Sheets/Hologram%20PDFs/SIM_DS_170107_v2.pdf?src-supplier=Digi-Key, ComponentLink1URL=https://media.digikey.com/pdf/Data%20Sheets/Hologram%20PDFs/SIM_DS_170107_v2.pdf?src-supplier=Digi-Key, Manufacturer Part Number=SIM-ST-MFF2, Pricing 1="1=6.3, 100=5.985 (USD)", Stock 1=0, Supplier 1=Digi-Key
U11: "IC SWITCH 4PDT 16MLP", LCSC Part Number=C512961, Manufacturer="ON Semiconductor / Fairchild", Max Operating Temperature=85°C, Max Supply Current=1uA, Max Supply Voltage=4.3V, Min Operating Temperature=-40°C, Min Supply Voltage=2.7V, Power Dissipation=500mW, Supplier Part Number 1=9108587, -3db Bandwidth=475MHz, Category="Interface ICs", ComponentLink1Description=https://datasheet.ciiva.com/4918/fsa2567-82876-4918495.pdf?src-supplier=Mouser, ComponentLink1URL=https://datasheet.ciiva.com/4918/fsa2567-82876-4918495.pdf?src-supplier=Mouser, ComponentLink2Description=https://datasheet.ciiva.com/17282/fsa2567-17282630.pdf?src-supplier=Future+Electronics, ComponentLink2URL=https://datasheet.ciiva.com/17282/fsa2567-17282630.pdf?src-supplier=Future+Electronics, ComponentLink3Description=https://datasheet.ciiva.com/2979/fsa2567-2979466.pdf?src-supplier=Avnet, ComponentLink3URL=https://datasheet.ciiva.com/2979/fsa2567-2979466.pdf?src-supplier=Avnet, ComponentLink4Description=https://datasheet.ciiva.com/6638/fsa2567-6638602.pdf?src-supplier=Digi-Key, ComponentLink4URL=https://datasheet.ciiva.com/6638/fsa2567-6638602.pdf?src-supplier=Digi-Key, ComponentLink5Description=https://datasheet.ciiva.com/6638/fsa2567-6638634.pdf?src-supplier=Digi-Key, ComponentLink5URL=https://datasheet.ciiva.com/6638/fsa2567-6638634.pdf?src-supplier=Digi-Key, ComponentLink6Description=https://datasheet.ciiva.com/2979/fsa2567-2979467.pdf?src-supplier=Avnet, ComponentLink6URL=https://datasheet.ciiva.com/2979/fsa2567-2979467.pdf?src-supplier=Avnet, Height=0.75mm, Item Type=IC, Lead Free="Lead Free", Length=3mm, Manufacturer Part Number=FSA2567MPX, Mounting Technology="Surface Mount", Number of Channels=1, Number of Inputs=4, Number of Outputs=8, Packaging="Tape and Reel", Pins=16, Pricing 1="3000=0.375, 6000=0.37, 9000=0.365, 12000=0.36 (USD)", Radiation Hardening=No, Reach SVHC Compliant=No, RoHS=Yes, RoHS Compliant=Yes, Series=-, Stock 1=48000, Supplier 1="Future Electronics", Supply Current=1uA, Supply Type=Single, Throw Configuration=4PDT, Weight=0.126g, Width=3mm